# Altium PCB XoomFloppy Pro.PcbDoc (part 2 of 2)
Units mm, origin at the board's own origin, x right, y up, seen from the top; angles counter-clockwise.
Board outline 99.59 x 50.28 mm, 2 copper layers (Top Layer, Bottom Layer), stack 1.569 mm thick; 33 components, 43 nets, 246 pads, 112 vias.
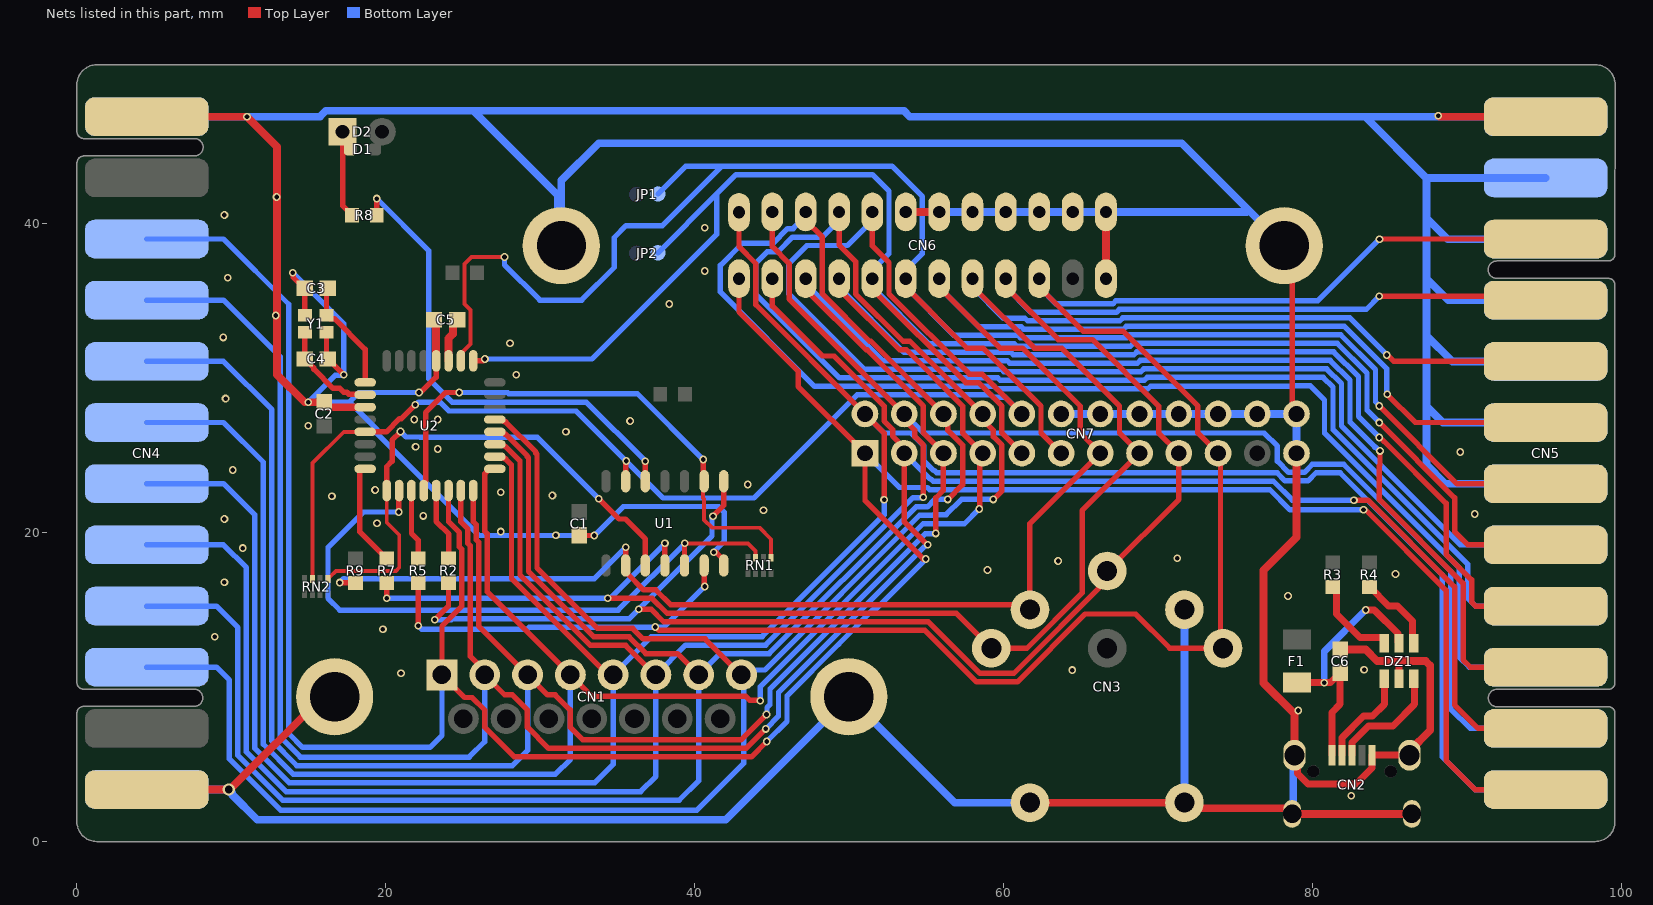
[diagram p2: the nets of this part, all layers, seen from the top]

## Via types
v1: diameter 0.5, hole 0.3, Top Layer to Bottom Layer, tented both sides, 111 vias
v2: diameter 0.8, hole 0.5, Top Layer to Bottom Layer, tented both sides, 1 vias

## Nets (pads, with @x,y where several pads share a name; then routed paths per layer and width w, separated by ;. In a path a pad name is that pad's centre, name@x,y a point inside that pad or via, vN(x,y) a via of type N, cw(c..) or ccw(c..) an arc to the next point about the centre after c; other vN are vias at no path point) (continued)
"DATA IN": R7.1 U2.8 | length 6.8
  Top Layer w0.35: U2.8@18.66,24.124 18.406,24.124 18.313,24.032 18.313,20.054 20.041,18.326 R7.1@20.066,18.326
"DATA OUT": RN2.1 U1.3 U2.9 | length 34.9
  Top Layer w0.25: RN2.1@16.248,17.002 16.248,17.092 16.283,17.127 16.373,17.127 16.772,17.526 20.651,17.526 20.866,17.741 20.866,19.853 20.06,20.659 U2.9@20.06,22.724
  Top Layer w0.35: U2.9@20.06,22.724 20.06,24.283 20.408,24.63 20.408,25.989 20.946,26.528 v1(20.946,26.547) ; v1(33.782,22.201) 35.102,20.881 35.507,20.881 36.799,19.589 U1.3@36.799,17.877
  Bottom Layer w0.35: v1(20.946,26.547) 21.304,26.189 22.187,26.189 22.212,26.164 29.818,26.164 v1(33.782,22.201)
"GBIP DAV": CN5.6 CN6.6 CN7.6 JP1.1 U2.26 | length 118.9
  Top Layer w0.25: U2.26@24.86,31.124 24.86,31.598 25.476,32.214 25.476,34.417 25.094,34.799 25.094,37.401 25.539,37.846 v1(27.686,37.846)
  Top Layer w0.35: CN6.6@53.665,36.442 53.665,35.892 57.612,31.945 58.675,31.945 62.421,28.199 62.421,26.447 CN7.6@63.722,25.146 ; v1(84.328,28.194) 89.359,23.163 CN5.6@95.087,23.163
  Bottom Layer w0.35: v1(27.686,37.846) 27.686,37.338 29.972,35.052 32.679,35.052 34.79,37.163 34.79,39.108 35.56,39.878 37.914,39.878 41.766,43.73 ; JP1.1@37.62,41.926 39.424,43.73 41.766,43.73 ; v1(84.328,28.194) 84.328,28.22 84.074,28.474 84.074,30.559 81.827,32.806 68.171,32.806 67.982,32.617 61.087,32.617 60.929,32.775 56.783,32.775 53.665,35.892 CN6.6@53.665,36.442 53.665,36.992 54.74,38.067 54.74,41.757 52.767,43.73 41.766,43.73
"GBIP EOI": CN5.5 CN6.5 CN7.5 JP2.1 U2.25 | length 115
  Top Layer w0.35: U2.25@25.66,31.124 26.298,31.124 v1(26.416,31.242) ; CN6.5@51.505,36.442 51.505,35.754 57.549,29.71 58.37,29.71 59.881,28.199 59.881,26.447 CN7.5@61.182,25.146 ; v1(84.328,27.123) 89.196,22.255 89.196,20.066 90.059,19.203 CN5.5@95.087,19.203
  Bottom Layer w0.35: v1(26.416,31.242) 33.346,31.242 41.414,39.309 41.414,41.91 ; JP2.1@37.62,38.116 41.414,41.91 ; v1(84.328,27.123) 83.524,27.927 83.524,30.331 81.599,32.256 68.399,32.256 68.21,32.067 60.859,32.067 60.701,32.225 55.173,32.225 51.505,35.892 CN6.5@51.505,36.442 51.505,36.992 52.58,38.067 52.58,42.105 51.505,43.18 42.684,43.18 41.414,41.91
"GBIP REN": CN5.E CN6.17 CN7.17 RN2.3 U1.13 U2.5 | length 146.4
  Top Layer w0.25: RN2.3@15.248,17.002 15.248,24.5 17.272,26.524 U2.5@18.66,26.524
  Top Layer w0.35: U2.5@18.66,26.524 20.04,26.524 20.9,27.384 21.015,27.384 v1(21.904,28.273) ; U1.13@35.529,23.327 35.544,23.343 35.544,24.622 v1(35.56,24.638) ; CN6.17@51.505,40.762 51.505,38.562 52.58,37.487 52.58,35.457 57.777,30.26 58.608,30.26 CN7.17@61.182,27.686
  Bottom Layer w0.35: v1(21.904,28.273) 21.944,28.273 22.119,28.448 23.512,28.448 24.086,27.874 32.324,27.874 v1(35.56,24.638) 37.958,22.24 43.824,22.24 50.509,28.925 56.615,28.925 56.617,28.923 56.907,28.923 56.909,28.925 59.155,28.925 59.313,28.767 60.101,28.767 CN7.17@61.182,27.686 ; CN6.17@51.505,40.762 51.505,40.212 49.88,38.587 47.26,38.587 46.1,37.427 46.1,35.457 50.982,30.575 59.859,30.575 60.016,30.417 68.893,30.417 69.082,30.606 80.916,30.606 81.874,29.648 81.874,26.901 89.572,19.203 CN5.E@95.087,19.203
GND: C1.1 C2.1 C3.1 C4.1 C5.1 C6.1 CN1.16 CN1.17 CN2.5 CN2.6 CN2.7 CN2.8 CN2.9 CN3.2 CN3.7 CN3.8 CN4.1 CN4.12 CN4.A CN4.N CN5.12 CN5.F CN5.H CN5.J CN5.K CN5.L CN5.M CN5.N CN6.12 CN6.18 CN6.19 CN6.20 CN6.21 CN6.22 CN6.23 CN6.24 CN6.Shield1 CN6.Shield2 CN7.12 CN7.18 CN7.19 CN7.20 CN7.21 CN7.22 CN7.23 CN7.24 DZ1.2 U1.7 U2.3 U2.28 Y1.2 Y1.4 | length 552.2
  Top Layer w0.35: v1(13.97,36.83) 13.999,36.801 13.999,36.534 14.719,35.814 C3.1@14.744,35.814 14.762,35.796 Y1.2@14.762,34.078 ; Y1.4@16.162,32.978 16.162,31.324 C4.1@16.244,31.242 16.269,31.242 17.272,30.239 v1(17.272,30.226) ; v1(22.151,29.073) 22.18,29.102 22.29,29.102 23.26,30.071 U2.28@23.26,31.124 ; C1.1@32.512,19.836 32.536,19.812 v1(33.497,19.812) ; v1(41.225,18.729) 41.384,18.729 41.879,18.234 U1.7@41.879,17.877 ; CN6.Shield2@78.165,38.582 78.698,38.049 78.698,27.949 CN7.24@78.962,27.686
  Top Layer w0.45: CN2.6@78.83,5.588 79.021,5.397 79.021,4.405 79.713,3.713 82.806,3.713 83.855,4.762 CN2.5@83.855,5.588 CN2.7@86.28,5.588 ; DZ1.2@85.598,10.534 85.598,11.684
  Top Layer w0.5: CN4.12@4.521,3.363 4.524,3.366 9.82,3.366 v2(9.823,3.369) 9.904,3.369 15.907,9.372 CN1.17@16.681,9.372 ; CN4.1@4.521,46.929 11.009,46.929 v1(11.015,46.923) 12.954,44.984 12.954,30.226 v1@14.744,28.436 ; v1@14.986,28.436 C2.1@16.002,28.436 16.002,28.411 16.289,28.124 U2.3@18.66,28.124 ; C5.1@23.126,33.782 23.25,33.658 23.25,31.134 U2.28@23.26,31.124 ; CN6.18@53.665,40.762 CN6.19@55.825,40.762 ; CN3.8@61.704,2.514 CN3.7@71.704,2.514 72.067,2.151 78.379,2.151 78.68,1.851 CN2.8@78.68,1.788 CN2.9@86.43,1.788 ; CN6.12@66.625,36.442 CN6.24@66.625,40.762 ; CN2.6@78.83,5.588 78.83,8.262 76.825,10.267 76.825,17.555 78.962,19.692 CN7.12@78.962,25.146 ; C6.1@81.788,12.434 83.443,12.434 84.193,11.684 85.598,11.684 87.337,11.684 87.63,11.391 87.63,7.213 86.28,5.863 CN2.7@86.28,5.588 ; v1(88.138,46.99) 88.199,46.929 CN5.12@95.087,46.929
  Bottom Layer w0.35: v1(13.97,36.83) 17.272,33.528 v1(17.272,30.226) 17.243,30.197 16.735,30.197 v1(14.986,28.448) 17.633,28.448 ; v1(22.151,29.073) 18.258,29.073 17.633,28.448 ; v1(41.225,18.729) 41.91,19.414 41.91,21.336 41.556,21.69 35.374,21.69 v1(33.497,19.812) 31.013,19.812 26.019,19.812 19.448,26.383 19.448,26.633 17.633,28.448
  Bottom Layer w0.5: CN4.N@4.521,3.369 v2(9.823,3.369) 10.043,3.149 10.043,3.043 11.679,1.407 42.016,1.407 CN1.16@49.981,9.372 56.839,2.514 CN3.8@61.704,2.514 ; CN4.A@4.521,46.929 4.527,46.923 v1(11.015,46.923) 15.734,46.923 16.117,47.306 25.654,47.306 ; CN6.19@55.825,40.762 CN6.20@57.985,40.762 CN6.21@60.145,40.762 CN6.22@62.305,40.762 CN6.23@64.465,40.762 CN6.24@66.625,40.762 75.749,40.762 ; CN7.18@63.722,27.686 CN7.19@66.262,27.686 CN7.20@68.802,27.686 CN7.21@71.342,27.686 CN7.22@73.882,27.686 CN7.23@76.422,27.686 CN7.24@78.962,27.686 CN7.12@78.962,25.146 ; CN3.7@71.704,2.514 CN3.2@71.704,15.014 ; CN6.Shield2@78.165,38.582 71.535,45.212 33.782,45.212 31.365,42.795 CN6.Shield1@31.365,38.582 31.128,38.819 31.128,41.832 25.654,47.306 ; CN2.8@78.68,1.788 78.755,1.863 78.755,5.513 CN2.6@78.83,5.588 ; CN5.F@95.087,23.163 88.597,23.163 87.376,24.384 87.376,28.194 ; CN5.H@95.087,27.123 88.447,27.123 87.376,28.194 ; CN5.J@95.087,31.083 89.057,31.083 87.374,32.766 ; CN5.K@95.087,35.043 88.795,35.043 87.374,36.464 ; CN5.M@95.087,42.963 87.374,42.963 ; CN5.N@95.087,46.923 83.414,46.923 ; CN5.L@95.089,39.003 88.757,39.003 87.374,40.386 ; 25.654,47.306 53.55,47.306 53.933,46.923 83.414,46.923 ; 83.414,46.923 87.374,42.963 ; 87.374,32.766 87.374,28.196 87.376,28.194 ; 87.374,32.766 87.374,36.464 ; 87.374,36.464 87.374,40.386 ; 87.374,40.386 87.374,42.963
  other v1: 82.499,2.972 79.07,8.484 20.98,10.897 64.44,11.1 83.337,11.125 8.915,13.259 19.811,13.736 78.41,15.9 9.55,16.789 85.369,17.323 58.953,17.577 63.525,18.161 71.247,18.339 10.744,18.999 31.013,19.837 27.432,20.066 19.431,20.599 9.55,20.879 22.428,21.082 90.5,21.209 44.45,21.446 16.51,22.352 30.785,22.403 27.432,22.606 19.304,22.758 43.434,23.114 10.084,24.054 89.56,25.222 23.368,25.412 21.929,25.564 31.66,26.524 14.986,26.924 35.814,27.229 21.845,27.324 23.368,27.324 9.627,28.677 28.448,30.226 28.037,32.258 9.474,32.639 12.878,34.061 38.354,34.798 9.76,36.506 40.64,36.935 40.64,39.738 9.55,40.564 12.929,41.732
"I/O 0": CN1.1 CN4.C CN5.1 CN6.1 CN7.1 U2.14 | length 189.3
  Top Layer w0.35: U2.14@24.06,22.724 24.06,20.709 24.766,20.003 24.766,19.075 24.91,18.931 24.91,15.217 23.636,13.943 CN1.1@23.636,10.792 25.101,9.327 25.591,9.327 26.406,8.512 26.406,7.402 26.416,7.392 26.416,7.382 28.321,5.477 43.665,5.477 v1(44.664,6.476) ; CN6.1@42.865,36.442 42.865,34.287 46.7,30.453 46.7,29.468 CN7.1@51.022,25.146 51.022,22.067 54.801,18.288 v1(54.966,18.288) ; v1(83.303,21.477) 83.332,21.448 83.454,21.448 88.646,16.256 88.646,5.245 90.528,3.363 CN5.1@95.087,3.363
  Bottom Layer w0.35: CN4.C@4.521,39.009 9.493,39.009 13.716,34.786 13.716,6.983 14.603,6.096 22.86,6.096 23.636,6.872 CN1.1@23.636,10.792 ; v1(44.664,6.476) 45.974,7.786 45.974,9.431 49.316,12.773 51.555,15.012 51.69,15.012 v1(54.966,18.288) ; CN7.1@51.022,25.146 53.244,22.924 55.059,22.924 55.207,22.776 77.247,22.776 78.546,21.477 v1(83.303,21.477)
"I/O 1": CN1.2 CN4.D CN5.2 CN6.2 CN7.2 U2.15 | length 178.8
  Top Layer w0.35: U2.15@24.86,22.724 24.86,20.687 25.316,20.231 25.316,19.303 25.46,19.159 25.46,12.003 26.406,11.057 CN1.2@26.406,10.792 27.699,9.499 28.189,9.499 29.166,8.521 29.166,7.402 30.541,6.027 43.331,6.027 v1(44.595,7.291) ; CN6.2@45.025,36.442 45.025,34.667 48.259,31.433 49.027,31.433 52.261,28.199 52.261,27.225 52.811,26.675 52.811,26.27 53.562,25.519 53.562,20.73 v1(55.082,19.21) ; v1(82.678,22.102) 83.578,22.102 89.196,16.484 89.196,8.848 90.721,7.323 CN5.2@95.087,7.323
  Bottom Layer w0.35: CN4.D@4.521,35.049 9.493,35.049 13.166,31.376 13.166,6.755 14.461,5.46 25.4,5.46 26.406,6.466 CN1.2@26.406,10.792 ; v1(44.595,7.291) 44.602,7.291 45.424,8.113 45.424,9.659 51.047,15.282 54.901,19.135 54.966,19.135 55.041,19.21 v1(55.082,19.21) ; CN7.2@53.562,25.146 55.234,23.474 55.287,23.474 55.435,23.326 77.475,23.326 78.699,22.102 v1(82.678,22.102)
"I/O 2": CN1.3 CN4.E CN5.3 CN6.3 CN7.3 U2.16 | length 187.5
  Top Layer w0.35: U2.16@25.66,22.724 25.66,20.709 25.866,20.503 25.866,19.531 26.01,19.387 26.01,13.958 CN1.3@29.176,10.792 30.469,9.499 30.959,9.499 31.936,8.521 31.936,7.402 32.761,6.577 42.997,6.577 44.644,8.224 v1(44.651,8.224) ; CN6.3@47.185,36.442 47.185,35.754 51.1,31.839 51.16,31.839 54.801,28.199 54.801,26.447 CN7.3@56.102,25.146 56.102,22.749 55.606,22.253 v1(55.606,19.949) ; v1(84.369,25.29) 84.369,24.381 84.328,24.34 84.328,22.13 89.746,16.712 89.746,11.75 90.213,11.283 CN5.3@95.087,11.283
  Bottom Layer w0.35: CN4.E@4.521,31.089 9.493,31.089 12.616,27.966 12.616,6.527 14.233,4.91 28.194,4.91 29.176,5.892 CN1.3@29.176,10.792 ; v1(44.651,8.224) 44.68,8.253 44.68,8.664 44.874,8.858 44.874,9.886 54.908,19.92 55.577,19.92 v1(55.606,19.949) ; CN6.3@47.185,36.442 47.185,36.143 52.203,31.125 60.246,31.125 60.403,30.967 68.665,30.967 68.854,31.156 81.144,31.156 82.424,29.876 82.424,27.153 84.04,25.537 84.082,25.537 84.328,25.29 v1(84.369,25.29)
"I/O 3": CN1.4 CN4.F CN5.4 CN6.4 CN7.4 U2.17 | length 180.8
  Top Layer w0.35: U2.17@27.06,24.124 26.689,24.124 26.535,23.97 26.535,23.937 26.416,23.818 26.416,20.07 26.56,19.926 26.56,16.178 28.199,14.539 CN1.4@31.946,10.792 33.321,9.417 43.299,9.417 43.571,9.145 44.22,9.145 v1(44.249,9.117) ; CN6.4@49.345,36.442 49.345,35.754 53.26,31.839 53.7,31.839 57.341,28.199 57.341,26.447 CN7.4@58.642,25.146 58.449,24.953 58.449,21.555 v1(58.42,21.526) ; v1(84.328,26.162) 84.369,26.162 84.615,25.915 84.628,25.915 88.646,21.897 88.646,18.589 90.296,16.939 90.296,15.509 90.562,15.243 CN5.4@95.087,15.243
  Bottom Layer w0.35: CN4.F@4.521,27.129 9.493,27.129 12.066,24.556 12.066,6.299 14.005,4.36 30.988,4.36 31.946,5.318 CN1.4@31.946,10.792 ; v1(44.249,9.117) 44.249,10.039 54.784,20.574 57.468,20.574 v1(58.42,21.526) ; CN6.4@49.345,36.442 49.345,35.892 53.563,31.675 60.474,31.675 60.631,31.517 68.437,31.517 68.626,31.706 81.372,31.706 82.974,30.104 82.974,27.516 v1(84.328,26.162)
"I/O 4": CN1.5 CN4.H CN5.A CN6.13 CN7.13 U2.18 | length 178.5
  Top Layer w0.35: U2.18@27.06,24.924 27.539,24.924 27.689,24.774 27.754,24.774 28.135,24.393 28.135,17.03 34.373,10.792 CN1.5@34.716,10.792 ; CN6.13@42.865,40.742 42.865,38.512 43.95,37.427 43.95,34.758 CN7.13@51.022,27.686 52.261,26.447 v1(52.261,22.13)
  Bottom Layer w0.35: CN4.H@4.521,23.169 9.493,23.169 11.516,21.146 11.516,6.033 13.739,3.81 33.528,3.81 34.716,4.998 CN1.5@34.716,10.792 37.191,13.267 44.365,13.267 52.261,21.162 v1(52.261,22.13) ; CN7.13@51.022,27.686 52.261,26.447 54.012,26.447 54.816,25.643 54.816,24.68 55.472,24.024 55.515,24.024 55.663,23.876 77.702,23.876 78.221,23.357 79.703,23.357 80.222,23.876 81.788,23.876 88.392,17.272 88.392,5.499 90.528,3.363 CN5.A@95.087,3.363
"I/O 5": CN1.6 CN4.J CN5.B CN6.14 CN7.14 U2.19 | length 175.3
  Top Layer w0.35: U2.19@27.06,25.724 27.539,25.724 27.689,25.574 27.754,25.574 28.685,24.643 28.685,17.257 33.242,12.7 35.528,12.7 37.436,10.792 CN1.6@37.486,10.792 ; CN6.14@45.025,40.762 45.025,38.512 46.11,37.427 46.11,35.138 CN7.14@53.562,27.686 53.562,27.313 54.251,26.625 54.251,26.209 54.801,25.659 v1(54.801,22.299)
  Bottom Layer w0.35: CN4.J@4.521,19.209 9.493,19.209 10.966,17.736 10.966,5.805 13.546,3.225 36.499,3.225 37.486,4.212 CN1.6@37.486,10.792 39.411,12.717 44.593,12.717 54.147,22.27 54.772,22.27 v1(54.801,22.299) ; CN7.14@53.562,27.686 54.801,26.447 76.872,26.447 77.723,25.596 77.723,24.633 78.449,23.907 79.475,23.907 79.994,24.426 82.016,24.426 88.942,17.5 88.942,8.594 90.213,7.323 CN5.B@95.087,7.323
"I/O 6": CN1.7 CN4.K CN5.C CN6.15 CN7.15 U2.20 | length 198.5
  Top Layer w0.35: U2.20@27.06,26.524 27.539,26.524 27.689,26.374 27.754,26.374 29.168,24.96 29.168,24.916 29.235,24.849 29.235,17.485 33.47,13.25 35.756,13.25 36.839,12.167 38.881,12.167 CN1.7@40.256,10.792 ; CN6.15@47.185,40.762 47.185,40.212 48.26,39.137 48.26,35.457 51.327,32.389 51.398,32.389 CN7.15@56.102,27.686 56.102,27.313 56.388,27.027 56.388,26.612 57.341,25.659 57.341,23.104 v1(56.388,22.151)
  Bottom Layer w0.35: CN4.K@4.521,15.249 4.53,15.24 9.031,15.24 10.416,13.855 10.416,5.577 13.318,2.675 38.997,2.675 40.256,3.934 CN1.7@40.256,10.792 41.631,12.167 44.821,12.167 54.328,21.674 55.059,21.674 55.536,22.151 v1(56.388,22.151) ; CN6.15@47.185,40.762 47.185,40.496 46.376,39.687 46.02,39.687 45.058,38.724 43.077,38.724 41.656,37.303 41.656,35.581 47.762,29.475 59.383,29.475 59.54,29.317 69.349,29.317 69.506,29.475 78.572,29.475 78.603,29.506 79.854,29.506 80.774,28.586 80.774,26.446 89.492,17.728 89.492,11.938 90.147,11.283 CN5.C@95.087,11.283
"I/O 7": CN1.8 CN4.L CN5.D CN6.16 CN7.16 U2.21 | length 195.8
  Top Layer w0.35: U2.21@27.06,27.324 27.539,27.324 27.689,27.174 27.754,27.174 29.718,25.21 29.718,25.144 29.785,25.077 29.785,17.713 33.698,13.8 35.984,13.8 36.66,13.124 40.677,13.124 43.009,10.792 CN1.8@43.026,10.792 ; CN6.16@49.345,40.762 49.345,38.622 50.42,37.547 50.42,35.457 53.487,32.389 53.938,32.389 CN7.16@58.642,27.686 58.642,27.313 59.331,26.625 59.331,26.209 59.881,25.659 59.881,22.701 v1(59.331,22.151)
  Bottom Layer w0.35: CN4.L@4.521,11.289 9.031,11.289 9.866,10.454 9.866,5.349 13.183,2.032 40.132,2.032 43.18,5.08 43.18,10.638 CN1.8@43.026,10.792 43.342,11.108 44.54,11.108 54.556,21.124 55.435,21.124 55.473,21.162 56.283,21.162 57.272,22.151 v1(59.331,22.151) ; CN6.16@49.345,40.762 49.345,40.212 48.27,39.137 46.338,39.137 45.375,38.174 44.687,38.174 43.942,37.429 43.942,35.455 49.372,30.025 59.611,30.025 59.768,29.867 69.121,29.867 69.31,30.056 80.688,30.056 81.324,29.42 81.324,26.673 90.042,17.955 90.042,15.763 90.562,15.243 CN5.D@95.087,15.243
"IFC / RESET": CN3.6 CN5.9 CN6.9 CN7.9 R2.2 U1.8 | length 125.4
  Top Layer w0.35: v1(23.171,14.361) 23.171,14.372 24.06,15.261 R2.2@24.06,16.726 ; v1(36.377,15.041) 37.177,15.041 37.994,14.224 55.134,14.224 58.469,10.889 60.655,10.889 66.704,16.938 CN3.6@66.704,17.514 71.342,22.152 CN7.9@71.342,25.146 70.041,26.447 70.041,28.199 65.745,32.495 63.542,32.495 60.145,35.892 CN6.9@60.145,36.442 ; v1(41.185,21.065) 41.879,21.758 U1.8@41.879,23.327 ; v1(84.328,35.306) 94.83,35.306 CN5.9@95.087,35.049
  Bottom Layer w0.35: v1(23.171,14.361) 24.248,14.361 24.323,14.436 35.772,14.436 v1(36.377,15.041) 41.117,19.781 41.117,20.956 41.185,21.024 v1(41.185,21.065) ; CN6.9@60.145,36.442 60.145,35.892 61.77,34.267 67.298,34.267 67.487,34.456 83.478,34.456 v1(84.328,35.306)
"NDAC / DATA": CN3.5 CN5.8 CN6.8 CN7.8 R7.2 U1.4 | length 122.9
  Top Layer w0.35: v1(20.066,15.748) R7.2@20.066,16.726 ; v1(34.373,15.748) 37.248,15.748 38.222,14.774 56.944,14.774 58.674,13.044 58.674,12.514 61.502,12.514 65.079,16.091 65.079,21.423 CN7.8@68.802,25.146 67.501,26.447 67.501,28.199 63.755,31.945 61.992,31.945 57.985,35.952 CN6.8@57.985,36.442 ; U1.4@38.069,17.877 v1(38.069,19.304) ; v1(84.814,31.496) 84.854,31.496 85.261,31.089 CN5.8@95.087,31.089
  Bottom Layer w0.35: v1(20.066,15.748) v1(34.373,15.748) 34.513,15.748 v1(38.069,19.304) ; CN6.8@57.985,36.442 57.985,35.892 60.003,33.875 61.385,33.875 61.542,33.717 67.526,33.717 67.715,33.906 82.426,33.906 83.752,32.58 83.752,32.558 v1(84.814,31.496)
NetCN2_2: CN2.2 DZ1.1 | length 6.4
  Top Layer w0.45: CN2.2@81.905,5.588 81.905,6.721 83.312,8.128 83.886,8.128 84.648,8.89 DZ1.1@84.648,10.534
NetCN2_3: CN2.3 DZ1.3 | length 7.6
  Top Layer w0.45: CN2.3@82.555,5.588 82.555,6.414 83.619,7.478 85.202,7.478 86.614,8.89 86.614,10.468 DZ1.3@86.548,10.534
NetD1_1: D1.1 D2.1 R8.2 | length 5.7
  Top Layer w0.35: D2.1@17.203,45.956 17.203,41.173 17.812,40.565 R8.2@17.812,40.54
NetDZ1_4: DZ1.4 R4.1 | length 5.2
  Top Layer w0.45: R4.1@83.686,16.472 83.711,16.472 84.92,15.263 85.489,15.263 86.473,14.278 86.473,12.909 DZ1.4@86.548,12.834
NetDZ1_6: DZ1.6 R3.1 | length 5.9
  Top Layer w0.45: R3.1@81.312,16.472 81.337,16.472 81.562,16.247 81.562,14.732 83.085,13.209 84.573,13.209 84.648,13.134 DZ1.6@84.648,12.834
NetR8_1: R8.1 U1.12 | length 31.7
  Top Layer w0.35: R8.1@19.412,40.54 v1(19.412,41.627) ; U1.12@36.799,23.327 v1(36.799,24.622)
  Bottom Layer w0.35: v1(19.412,41.627) 22.776,38.263 22.776,30.264 22.77,30.258 22.77,29.968 24.29,28.448 32.973,28.448 v1(36.799,24.622)
"NFRD / CLK": CN3.4 CN5.7 CN6.7 CN7.7 R9.2 U1.2 | length 122.3
  Top Layer w0.35: v1(17.018,16.764) 17.037,16.745 18.015,16.745 R9.2@18.034,16.726 ; v1(35.529,19.05) U1.2@35.529,17.877 35.61,17.795 35.61,17.37 36.683,16.298 37.476,16.298 38.45,15.324 61.394,15.324 CN3.4@61.704,15.014 61.704,20.588 CN7.7@66.262,25.146 64.961,26.447 64.961,28.199 61.215,31.945 59.772,31.945 55.825,35.892 CN6.7@55.825,36.442 ; v1(84.836,28.956) 86.663,27.129 CN5.7@95.087,27.129
  Bottom Layer w0.35: v1(17.018,16.764) 17.272,17.018 33.497,17.018 v1(35.529,19.05) ; CN6.7@55.825,36.442 55.825,35.892 58.393,33.325 61.157,33.325 61.315,33.167 67.754,33.167 67.943,33.356 82.055,33.356 84.814,30.597 84.814,28.978 v1(84.836,28.956)
"RESET IN": R2.1 U2.13 | length 4.8
  Top Layer w0.35: U2.13@23.26,22.724 23.26,20.731 24.086,19.905 24.086,18.352 R2.1@24.06,18.326
"RESET OUT": RN1.1 U1.9 U2.12 | length 35.4
  Top Layer w0.25: U1.9@40.545,23.327 40.545,22.228 40.609,22.165 40.609,20.828 41.117,20.32 44.196,20.32 44.946,19.57 RN1.1@44.946,18.377
  Top Layer w0.35: U2.12@22.46,22.724 22.46,23.203 22.578,23.321 22.578,27.775 23.876,29.073 v1(24.758,29.073) ; v1(40.545,24.732) 40.545,23.992 40.561,23.977 40.561,23.375 U1.9@40.609,23.327
  Bottom Layer w0.35: v1(24.758,29.073) 27.891,29.073 27.966,28.998 36.279,28.998 v1(40.545,24.732)
SRQ: CN3.1 CN5.10 CN6.10 CN7.10 R5.2 U1.6 | length 130.8
  Top Layer w0.35: v1(22.098,13.97) R5.2@22.098,16.726 ; v1(37.442,13.892) 37.473,13.892 37.691,13.674 54.906,13.674 58.241,10.339 60.883,10.339 65.276,14.732 68.55,14.732 70.768,12.514 CN3.1@74.204,12.514 74.043,12.675 74.043,24.985 CN7.10@73.882,25.146 72.581,26.447 72.581,28.199 67.735,33.045 65.152,33.045 62.305,35.892 CN6.10@62.305,36.442 ; U1.6@40.609,17.877 40.609,17.01 40.611,17.007 40.611,16.539 v1(40.64,16.51) ; v1(84.332,38.999) 84.343,39.009 CN5.10@95.087,39.009
  Bottom Layer w0.35: v1(22.098,13.97) 22.332,13.736 29.145,13.736 29.295,13.886 38.016,13.886 v1(40.64,16.51) ; CN6.10@62.305,36.442 62.305,35.892 63.38,34.817 67.07,34.817 67.259,35.006 80.331,35.006 84.324,38.999 v1(84.332,38.999)
"SRQ IN": R5.1 U2.11 | length 4.6
  Top Layer w0.35: U2.11@21.66,22.724 21.66,19.95 22.098,19.512 R5.1@22.098,18.326
"SRQ OUT": RN1.3 U1.5 U2.10 | length 42.1
  Top Layer w0.25: v1(39.363,19.304) 43.446,19.304 43.931,18.819 43.931,18.392 RN1.3@43.946,18.377
  Top Layer w0.35: v1(20.828,21.336) 20.844,21.352 20.844,22.708 U2.10@20.86,22.724 ; U1.5@39.339,17.877 v1@39.339,19.304
  Bottom Layer w0.35: v1(20.828,21.336) 18.542,21.336 16.256,19.05 16.256,15.748 17.018,14.986 35.045,14.986 v1(39.363,19.304)
UCAP: C5.2 U2.27 | length 2.9
  Top Layer w0.5: U2.27@24.06,31.124 24.06,32.574 24.351,32.865 24.351,33.532 24.601,33.782 C5.2@24.626,33.782
VBUS: C6.2 CN2.1 DZ1.5 F1.1 | length 17.8
  Top Layer w0.45: F1.1@78.994,10.284 v1(80.759,10.284) 81.163,10.284 C6.2@81.788,10.909 ; CN2.1@81.255,5.588 81.255,8.357 81.788,8.89 C6.2@81.788,10.909 ; C6.2@81.788,10.934 C6.2@81.788,10.909 ; v1(83.443,14.986) 83.997,14.986 85.523,13.46 85.523,12.909 DZ1.5@85.598,12.834
  Bottom Layer w0.45: v1(80.759,10.284) 80.759,12.302 v1(83.443,14.986)
XTAL1: C3.2 U2.1 Y1.1 | length 7.3
  Top Layer w0.35: C3.2@16.244,35.814 16.162,35.732 Y1.1@16.162,34.078 16.387,33.853 16.667,33.853 18.66,31.86 U2.1@18.66,29.724
XTAL2: C4.2 U2.2 Y1.3 | length 6.7
  Top Layer w0.35: Y1.3@14.762,32.978 14.762,31.26 C4.2@14.744,31.242 14.769,31.242 15.341,30.67 15.341,30.589 16.595,29.336 17.023,29.336 17.26,29.099 17.473,29.099 17.61,28.962 18.622,28.962 U2.2@18.66,28.924
pads on no net: CN1.11 CN1.12 CN1.13 CN1.14 CN1.15 CN2.4 CN2.10 CN2.11 CN4.2 CN4.3 CN4.4 CN4.5 CN4.6 CN4.7 CN4.9 CN4.10 CN4.11 CN4.M RN1.4 RN1.5 RN2.4 RN2.5

## Polygon pours and split planes (outlines as drawn)
GND on Top Layer "Top Layer - GND" (solid, remove dead copper, pour order 0): 0,1.271 0,8.32 cw(c0.424,8.32) 0.424,8.744 7.633,8.744 ccw(c7.581,9.305) 7.608,9.868 0.424,9.868 cw(c0.424,10.292) 0,10.292 0,43.924 cw(c0.465,43.924) 0.465,44.389 7.649,44.389 ccw(c7.609,44.951) 7.639,45.513 0.455,45.513 cw(c0.455,45.968) 0,45.968 0,49.014 cw(c1.27,49.014) 1.27,50.284 98.318,50.284 cw(c98.318,49.014) 99.588,49.014 99.581,49.014 99.581,38.032 cw(c99.137,38.032) 99.137,37.588 91.934,37.588 ccw(c91.934,37.026) 91.934,36.464 99.142,36.464 cw(c99.145,36.027) 99.581,36.03 99.58,36.03 99.58,10.282 99.579,10.282 cw(c99.148,10.282) 99.148,9.852 91.945,9.852 ccw(c91.945,9.29) 91.945,8.728 99.153,8.728 cw(c99.153,8.302) 99.579,8.303 99.581,8.303 99.581,1.27 cw(c98.311,1.27) 98.311,0 1.27,0 1.27,0.001 cw(c1.27,1.271)
GND on Bottom Layer "Bottom Layer - GND" (solid, remove dead copper, pour order 1): 0,1.271 0,8.32 cw(c0.424,8.32) 0.424,8.744 7.633,8.744 ccw(c7.581,9.305) 7.608,9.868 0.424,9.868 cw(c0.424,10.292) 0,10.292 0,43.924 cw(c0.465,43.924) 0.465,44.389 7.649,44.389 ccw(c7.609,44.951) 7.639,45.513 0.455,45.513 cw(c0.455,45.968) 0,45.968 0,49.014 cw(c1.27,49.014) 1.27,50.284 98.318,50.284 cw(c98.318,49.014) 99.588,49.014 99.581,49.014 99.581,38.032 cw(c99.137,38.032) 99.137,37.588 91.934,37.588 ccw(c91.934,37.026) 91.934,36.464 99.142,36.464 cw(c99.145,36.027) 99.581,36.03 99.58,36.03 99.58,10.282 99.579,10.282 cw(c99.148,10.282) 99.148,9.852 91.945,9.852 ccw(c91.945,9.29) 91.945,8.728 99.153,8.728 cw(c99.153,8.302) 99.579,8.303 99.581,8.303 99.581,1.27 cw(c98.311,1.27) 98.311,0 1.27,0 1.27,0.001 cw(c1.27,1.271)

## Silkscreen, mask and mechanical layers (free items; w line width, h text height)
Top Overlay:
  text "JLCJLCJLCJLC" at 28.302,47.056 h1.5
  text "ACT" at 20.172,41.96 h3
  text "Parallel-Port" at 10.962,32.927 h3 r270
  text "IEEE-488-Ports" at 45.379,31.785 h3
  text "IEC" at 64.63,19.271 h3
  text "IEEE-488-Port" at 88.292,16.645 h3 r90
  text "Parallel-Port" at 27.849,13.586 h3
  text "USB" at 79.882,7.135 h3
Bottom Overlay:
  drawing of 25 lines, arcs and shapes, not listed
  text "XoomFloppy Pro" at 80.695,43.121 h6
  text "Version: '.Version' / Revision: '.Revision' / Date: 18.11.2019" at 73.547,5.903 h2
  text "Developed © 2010 Nate Lawson / PCB © 2019 Dirk Wouters" at 54.54,0.878 h4
Board:
  lines w0.1: 0,45.968 ccw(c0.455,45.968) 0.455,45.513 7.639,45.513 cw(c7.609,44.951) 7.649,44.389 0.465,44.389 ccw(c0.465,43.924) 0,43.924 ; 0.424,8.744 ccw(c0.424,8.32) 0,8.32 0,1.271 ccw(c1.27,1.271) 1.27,0.001 ; 0.424,8.744 7.633,8.744 ccw(c7.581,9.305) 7.608,9.868 0.424,9.868 cw(c0.424,10.292) 0,10.292 0,43.924 ; 1.27,0 98.311,0 ccw(c98.311,1.27) 99.581,1.27 99.581,8.303 99.579,8.303 ccw(c99.153,8.302) 99.153,8.728 ; 0,43.924 0,43.924 ; 0,45.97 0,49.014 cw(c1.27,49.014) 1.27,50.284 98.318,50.284 cw(c98.318,49.014) 99.588,49.014 99.581,49.014 99.581,38.032 cw(c99.137,38.032) 99.137,37.588 91.934,37.588 ccw(c91.934,37.026) 91.934,36.464 99.142,36.464 cw(c99.145,36.027) 99.581,36.03 99.579,36.03 99.58,10.282 ; 0,45.97 0,45.97 ; 91.945,8.728 cw(c91.945,9.29) 91.945,9.852 99.148,9.852 ccw(c99.148,10.282) 99.579,10.282 ; 91.945,8.728 99.153,8.728 ; 91.945,8.728 91.945,8.728 ; 99.153,8.728 99.153,8.728 ; 99.579,10.282 99.58,10.282
Top Dimensions:
  lines w0.1: 2,50.284 97.589,50.284 97.556,0 2,0 2,50.292

## Text inside footprints (layer, text, board x,y; h text height)
D2: Top Assembly "+" at 21.14,45.448 h1; Top Overlay "+" at 21.14,45.448 h1